# Altium PCB PCB_Down.PcbDoc (part 2 of 2)
Units mm, origin at the board's own origin, x right, y up, seen from the top; angles counter-clockwise.
Board outline 152.02 x 107.03 mm, 2 copper layers (Top Layer, Bottom Layer); 218 components, 149 nets, 1560 pads, 136 vias.
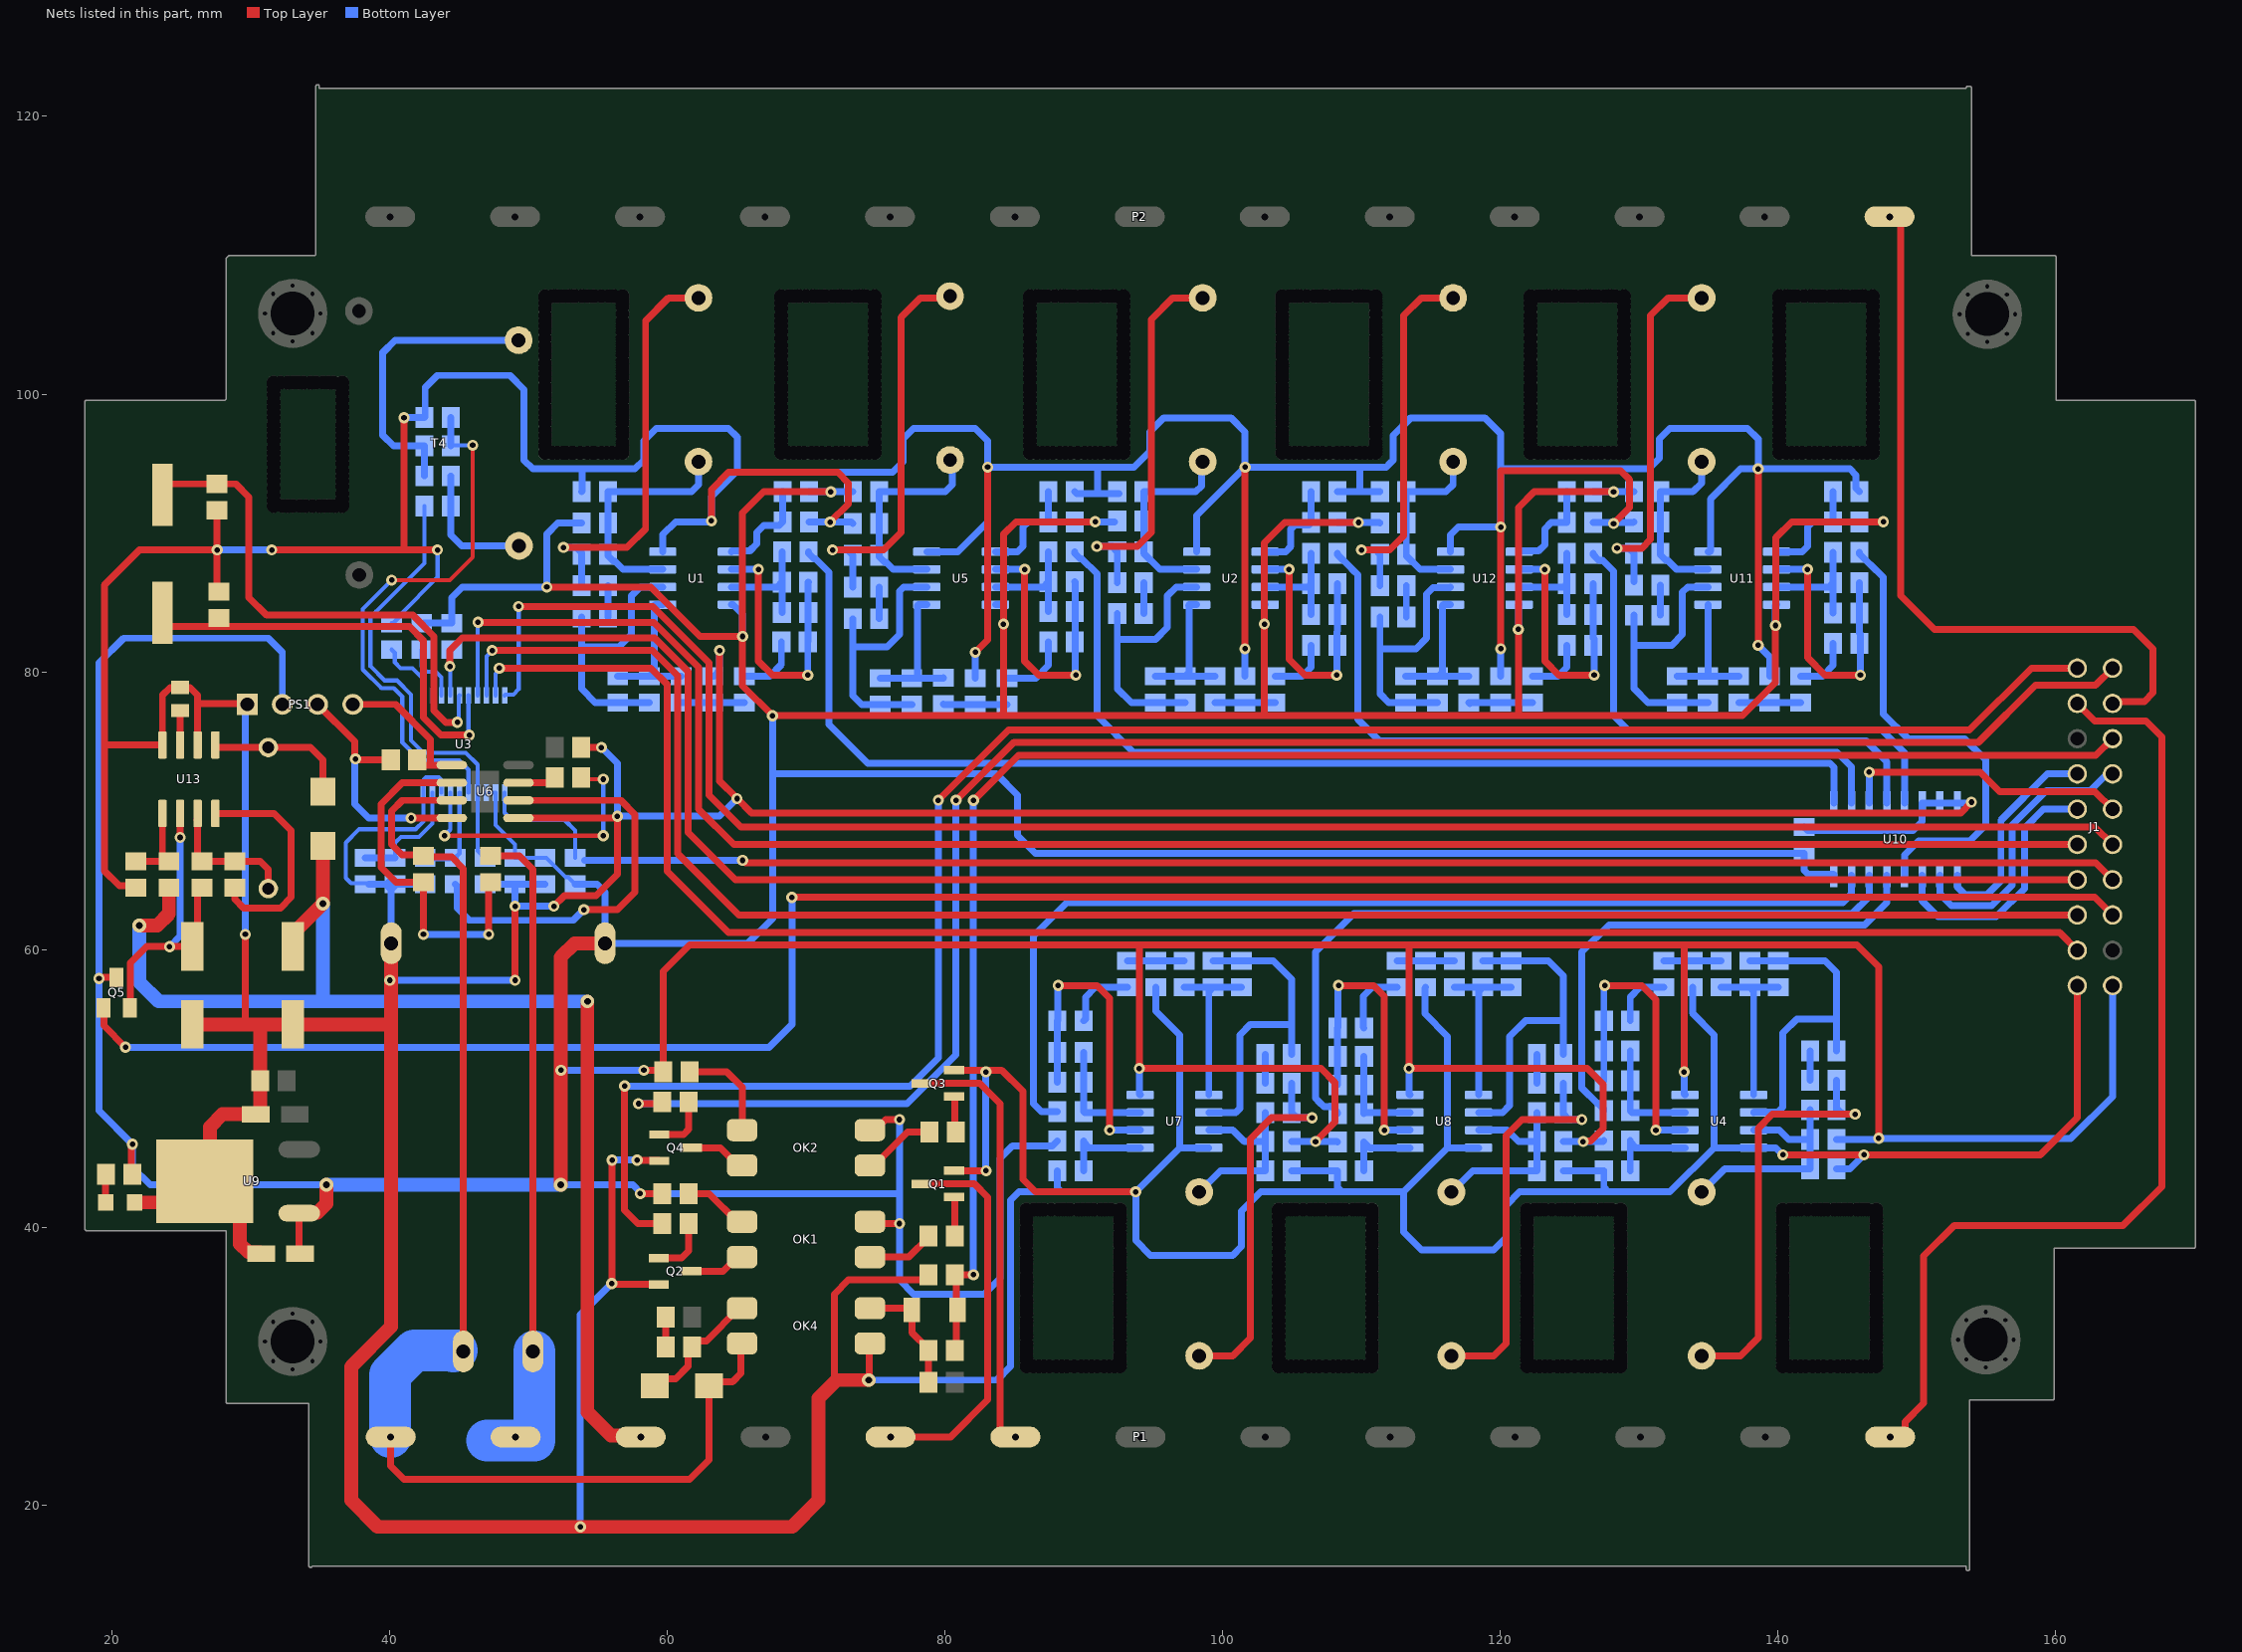
[diagram p2: the nets of this part, all layers, seen from the top]

## Via types
v1: diameter 0.8, hole 0.4, Top Layer to Bottom Layer, 115 vias
v2: diameter 1.27, hole 0.711, Top Layer to Bottom Layer, 15 vias
v3: diameter 1, hole 0.5, Top Layer to Bottom Layer, 6 vias

## Nets (pads, with @x,y where several pads share a name; then routed paths per layer and width w, separated by ;. In a path a pad name is that pad's centre, name@x,y a point inside that pad or via, vN(x,y) a via of type N, cw(c..) or ccw(c..) an arc to the next point about the centre after c; other vN are vias at no path point) (continued)
5V: ?.P$4 C12.1 C13.1 C37.1 C42.2 J1.20 OK1.4 OK2.4 PS1.2 Q5.3 R1.1 R6.2 R8.2 R20.1 R21.2 R22.2 R29.1 R33.2 R44.1 R45.1 R48.2 R51.2 R58.2 R70.2 R77.2 R83.2 R86.1 R88.2 R93.2 R101.2 R103.2 R112.2 U1.8 U2.8 U3.2 U3.3 U4.8 U5.8 U7.8 U8.8 U9.1 U10.16 U11.8 U12.8 | length 767.5
  Top Layer w0.5: v1(19.05,57.912) 19.131,57.912 19.232,58.013 20.303,58.013 Q5.3@20.32,57.996 ; R86.1@21.445,43.815 21.391,43.87 21.391,45.902 v1(21.463,45.974) ; U9.1@33.47,41.007 33.47,38.164 C42.2@33.534,38.1 ; v1(51.308,86.106) 58.801,86.106 62.357,82.55 v1(65.405,82.55) ; v1(58.039,42.418) R1.1@59.629,42.418 ; v1(58.293,51.308) 59.568,51.308 R20.1@59.695,51.181 59.695,58.425 61.595,60.325 93.853,60.325 ; v1(71.766,92.964) 66.929,92.964 65.405,91.44 v1(65.405,82.55) ; OK1.4@74.577,40.386 74.704,40.259 v1(76.708,40.259) ; OK2.4@74.577,46.99 74.958,46.99 75.72,47.752 v1(76.708,47.752) ; v1(84.201,83.439) 84.201,77.074 83.962,76.835 ; v1@84.201,83.578 84.201,89.916 85.09,90.805 v1(90.805,90.805) ; v1(106.68,46.164) 108.077,47.561 108.077,50.419 107.061,51.435 v1(93.98,51.435) 93.98,60.198 93.853,60.325 ; v1(109.769,90.754) 104.47,90.754 102.997,89.281 v1(102.997,83.439) 102.997,76.962 102.87,76.835 ; v1(125.951,46.164) 126.009,46.222 126.486,46.222 127.381,47.117 127.381,50.292 126.238,51.435 v1(113.411,51.435) 113.411,60.198 113.538,60.325 ; v1(128.143,92.964) 122.428,92.964 121.285,91.821 v1(121.285,83.058) 121.285,76.835 ; v1(133.223,51.181) 133.223,60.198 133.096,60.325 ; v1(139.806,83.335) v1@139.806,83.333 ; v1(147.241,46.403) 147.241,58.753 145.669,60.325 133.096,60.325 ; v1(147.574,90.805) 140.97,90.805 139.827,89.662 139.827,83.312 v1@139.806,83.333 ; v1(65.405,82.55) 65.405,78.994 v1(67.564,76.835) 83.962,76.835 ; 83.962,76.835 84.201,76.835 102.87,76.835 ; 93.853,60.325 113.538,60.325 ; 102.87,76.835 121.285,76.835 ; 113.538,60.325 133.096,60.325 ; 121.285,76.835 137.414,76.835 139.806,79.227 v1@139.806,83.333
  Top Layer w1: U9.1@33.47,41.007 33.508,41.045 34.785,41.045 35.433,41.693 v3(35.433,43.053) ; v3(52.324,43.053) v1(52.324,51.308) 52.324,59.451 53.325,60.452 ?.P$4@55.499,60.452
  Bottom Layer w0.3: U3.3@46.964,71.303 U3.2@47.614,71.303 47.614,68.972 49.022,67.564 C12.1@49.022,66.609 C13.1@51.181,66.609 51.281,66.609 52.681,65.209 52.84,65.209 R29.1@53.34,64.709
  Bottom Layer w0.5: PS1.2@32.258,77.656 32.258,81.407 31.242,82.423 20.828,82.423 19.05,80.645 v1(19.05,57.912) 19.05,48.387 v1(21.463,45.974) 21.463,44.323 22.733,43.053 v3(35.433,43.053) ; R45.1@42.291,83.5 R44.1@44.45,83.5 44.45,85.344 45.212,86.106 v1(51.308,86.106) 51.308,89.916 52.102,90.71 R6.2@53.812,90.71 ; v3(52.324,43.053) 57.495,43.053 v1@58.13,42.418 ; v1(52.324,51.308) v1(58.293,51.308) ; R29.1@53.34,64.709 54.925,64.709 55.499,64.135 ?.P$4@55.499,60.452 65.786,60.452 67.564,62.23 67.564,72.652 ; v1(58.039,42.418) 76.708,42.418 ; U1.8@64.597,84.836 64.72,84.836 65.405,84.151 v1(65.405,82.55) ; R21.2@70.188,92.964 v1(71.766,92.964) R48.2@73.344,92.964 ; v1(76.708,47.752) 76.708,42.418 ; U5.8@83.623,84.836 84.151,84.836 84.201,84.786 v1(84.201,83.439) ; R83.2@88.078,46.196 87.729,45.847 84.836,45.847 83.947,44.958 83.947,36.322 82.804,35.179 77.724,35.179 76.708,36.195 v1(76.708,40.259) 76.708,42.418 ; R58.2@89.341,90.805 v1(90.805,90.805) R8.2@92.206,90.805 ; v1(93.98,51.435) 93.98,49.58 94.03,49.53 U7.8@94.05,49.53 ; v1(102.997,83.439) 102.997,84.786 103.047,84.836 U2.8@103.054,84.836 ; R70.2@104.962,46.164 v1(106.68,46.164) 108.231,46.164 R88.2@108.269,46.126 ; R22.2@108.265,90.754 v1(109.769,90.754) 111.273,90.754 R101.2@111.318,90.71 ; v1(113.411,51.435) 113.411,49.58 113.461,49.53 U8.8@113.481,49.53 ; v1(121.285,83.058) 121.285,84.786 121.335,84.836 U12.8@121.342,84.836 ; R77.2@124.521,46.164 v1(125.951,46.164) 127.382,46.164 R51.2@127.446,46.228 ; R112.2@126.68,92.964 v1(128.143,92.964) R93.2@129.606,92.964 ; v1(133.223,51.181) 133.223,49.58 133.273,49.53 U4.8@133.293,49.53 ; v1(139.806,83.335) 139.806,84.786 139.856,84.836 U11.8@139.884,84.836 ; U10.16@144.018,65.354 144.018,65.388 144.001,65.405 142.152,65.405 141.859,65.698 C37.1@141.859,66.929 86.487,66.929 85.217,68.199 85.217,71.12 83.685,72.652 67.564,72.652 ; R33.2@144.206,46.323 147.161,46.323 v1(147.241,46.403) 161.084,46.403 164.084,49.403 J1.20@164.084,57.404 ; R103.2@145.857,90.78 147.549,90.78 v1(147.574,90.805) ; 67.564,72.652 v1(67.564,76.835) 67.564,72.652
  Bottom Layer w1: v3(35.433,43.053) v3(52.324,43.053)
9: P1.9 Q1.3 | length 27.9
  Top Layer w0.5: P1.9@76.065,24.892 80.391,24.892 83.058,27.559 83.058,42.164 82.108,43.114 Q1.3@78.295,43.114
11: P1.8 Q3.3 | length 31.1
  Top Layer w0.5: Q3.3@78.295,50.353 82.481,50.353 83.947,48.887 83.947,25.354 84.409,24.892 P1.8@85.065,24.892
12V: C57.1 D6.2 P1.11 R115.1 | length 90.6
  Top Layer w1: v3(21.971,61.722) 23.241,61.722 24.088,62.569 R115.1@24.088,64.455 ; C57.1@33.02,60.21 33.02,61.16 v3(35.179,63.319) D6.2@35.179,67.454 ; v3(54.229,56.261) 54.229,26.67 55.92,24.979 57.978,24.979 P1.11@58.065,24.892
  Bottom Layer w1: v3(21.971,61.722) 21.971,57.658 23.368,56.261 35.179,56.261 ; v3(35.179,63.319) 35.179,56.261 ; v3(54.229,56.261) 35.179,56.261
4051_CT_Output: J1.10 U10.3 | length 20.9
  Top Layer w0.5: v1(146.558,72.771) 154.559,72.771 155.956,71.374 162.814,71.374 J1.10@164.084,70.104
  Bottom Layer w0.5: U10.3@146.558,70.536 v1(146.558,72.771)
A: J1.9 U10.11 | length 19.3
  Bottom Layer w0.5: U10.11@150.368,65.354 150.368,63.5 151.511,62.357 155.702,62.357 157.734,64.389 157.734,68.73 159.108,70.104 J1.9@161.544,70.104
AMC_+V: C59.2 PS1.4 U6.1 | length 11.2
  Top Layer w0.5: PS1.4@37.338,77.656 40.404,77.656 42.926,75.134 42.926,73.279 ; C59.2@41.971,73.787 41.971,73.687 42.379,73.279 42.926,73.279 ; U6.1@44.463,73.279 42.926,73.279
AMC_-V: C59.1 PS1.3 U6.4 | length 18.4
  Top Layer w0.5: PS1.3@34.798,77.656 37.465,74.989 v1@37.465,73.787 ; v1(37.528,73.724) v1@37.465,73.787 ; C59.1@40.071,73.66 37.592,73.66 v1@37.465,73.787 ; v1(41.529,69.469) U6.4@44.463,69.469
  Bottom Layer w0.5: v1(37.528,73.724) 37.471,73.666 37.471,73.454 37.465,73.448 37.465,70.485 38.481,69.469 v1(41.529,69.469)
B: J1.8 U10.10 | length 20.6
  Bottom Layer w0.5: U10.10@151.638,65.354 151.638,64.008 152.489,63.157 155.371,63.157 156.845,64.631 156.845,68.973 159.312,71.44 162.48,71.44 163.684,72.644 J1.8@164.084,72.644
"Boost control": J1.16 Q5.1 | length 157
  Top Layer w0.5: Q5.1@19.37,55.796 19.402,55.764 19.402,54.512 v1(20.955,52.959) ; v1(68.961,63.754) 162.814,63.754 J1.16@164.084,62.484
  Bottom Layer w0.5: v1(20.955,52.959) 67.31,52.959 68.961,54.61 v1(68.961,63.754)
C: J1.7 U10.9 | length 15.8
  Bottom Layer w0.5: U10.9@152.908,65.354 152.925,65.337 152.925,64.499 153.467,63.957 155.039,63.957 156.045,64.963 156.045,69.304 159.385,72.644 J1.7@161.544,72.644
CF: R49.2 U3.11 | length 4.8
  Bottom Layer w0.3: R49.2@40.132,81.6 40.355,81.376 40.355,80.676 40.767,80.264 41.635,80.264 42.414,79.485 U3.11@42.414,78.303
CS: J1.11 U3.17 | length 133.1
  Top Layer w0.5: v1(46.355,83.566) 59.005,83.566 62.238,80.333 62.238,70.096 64.77,67.564 J1.11@161.544,67.564
  Bottom Layer w0.3: U3.17@46.314,78.303 46.314,83.525 v1(46.355,83.566)
CT_1: C8.1 U10.4 | length 54.9
  Bottom Layer w0.5: C8.1@108.265,88.544 108.265,88.444 109.121,87.589 109.124,87.589 109.419,87.293 109.419,87.29 109.728,86.981 109.728,76.581 111.303,75.006 146.355,75.006 147.828,73.533 U10.4@147.828,70.536
CT_2: C20.1 U10.13 | length 37.5
  Bottom Layer w0.5: C20.1@127.446,48.387 127.446,48.487 127.046,48.887 126.992,48.887 125.857,50.022 125.857,59.817 127.813,61.773 146.228,61.773 147.828,63.373 U10.13@147.828,65.354
CT_3: C36.1 U10.15 | length 75.6
  Bottom Layer w0.5: C36.1@88.078,48.323 86.932,48.323 86.36,48.895 86.36,60.96 88.773,63.373 144.653,63.373 145.288,64.008 U10.15@145.288,65.354
CT_4: C48.1 U10.12 | length 34
  Bottom Layer w0.5: C48.1@145.857,88.595 145.857,88.495 146.629,87.723 146.657,87.723 147.574,86.806 147.574,76.962 149.352,75.184 153.416,75.184 154.94,73.66 154.94,68.961 153.797,67.818 150.114,67.818 149.098,66.802 U10.12@149.098,65.354
CT_5: C7.1 U10.1 | length 89.4
  Bottom Layer w0.5: C7.1@70.165,88.646 70.165,88.546 70.565,88.146 70.665,88.146 71.628,87.183 71.628,76.2 74.422,73.406 143.725,73.406 144.018,73.113 U10.1@144.018,70.536
CT_6: C28.1 U10.2 | length 71
  Bottom Layer w0.5: C28.1@89.341,88.646 89.341,88.546 89.741,88.146 89.841,88.146 90.932,87.055 90.932,76.835 93.561,74.206 144.234,74.206 145.288,73.152 U10.2@145.288,70.536
CT_7: C40.1 U10.14 | length 55.7
  Bottom Layer w0.5: C40.1@108.269,48.184 108.269,48.268 107.869,48.668 107.292,48.668 106.973,48.987 106.68,49.28 106.68,59.817 109.436,62.573 145.326,62.573 146.558,63.805 U10.14@146.558,65.354
CT_8: C53.1 U10.5 | length 38.2
  Bottom Layer w0.5: C53.1@126.68,88.544 126.68,88.444 127.08,88.044 127.348,88.044 128.143,87.249 128.143,76.835 129.172,75.806 147.46,75.806 149.098,74.168 U10.5@149.098,70.536
DIN: J1.12 U3.20 | length 134.7
  Top Layer w0.5: v1(49.276,84.709) 58.928,84.709 62.992,80.645 62.992,71.12 65.278,68.834 162.814,68.834 J1.12@164.084,67.564
  Bottom Layer w0.3: U3.20@48.264,78.303 48.314,78.353 48.314,78.359 48.895,78.359 49.276,78.74 v1(49.276,84.709)
DIn2: C30.2 D3.1 J1.6 R67.1 | length 124.8
  Top Layer w0.5: R67.1@80.701,31.115 80.8,31.214 80.8,33.937 D3.1@80.899,34.036 80.803,34.132 80.803,36.48 80.899,36.576 v1(82.042,36.576) ; v1(82.042,70.739) 85.283,73.98 162.88,73.98 J1.6@164.084,75.184
  Bottom Layer w0.5: v1(82.042,36.576) 82.027,36.591 82.027,70.724 v1(82.042,70.739)
DOUT: J1.17 U3.19 | length 132
  Top Layer w0.5: v1(47.879,80.264) 58.801,80.264 59.976,79.089 59.976,65.627 64.389,61.214 160.274,61.214 J1.17@161.544,59.944
  Bottom Layer w0.3: U3.19@47.614,78.303 47.614,79.864 47.879,80.129 v1(47.879,80.264)
Dout1: J1.1 R7.2 | length 140
  Top Layer w0.5: v1(56.911,50.165) 56.911,41.223 57.875,40.259 R7.2@59.629,40.259 ; v1(79.502,70.754) 84.551,75.803 153.781,75.803 158.242,80.264 J1.1@161.544,80.264
  Bottom Layer w0.5: v1(56.911,50.165) 77.47,50.165 79.502,52.197 v1(79.502,70.754)
Dout2: J1.2 R27.2 | length 131.7
  Top Layer w0.5: v1(57.912,48.895) 59.502,48.895 R27.2@59.629,49.022 ; v1(80.787,70.754) 80.787,70.763 84.955,74.93 154.432,74.93 158.537,79.035 162.855,79.035 J1.2@164.084,80.264
  Bottom Layer w0.5: v1(57.912,48.895) 77.266,48.895 80.772,52.401 80.772,70.739 v1(80.787,70.754)
GND: ?.P$3 C11.2 C12.2 C13.2 C16.2 C18.1 C19.2 C24.1 C25.1 C26.1 C30.1 C37.2 C42.1 C43.1 C44.2 C55.2 C56.1 C57.2 C58.1 D5.1 J1.19 OK4.3 PS1.1 Q1.2 Q2.2 Q3.2 Q4.2 R2.1 R3.1 R23.1 R24.1 R25.1 R26.1 R30.1 R38.1 R49.1 R55.1 R57.1 R60.1 R61.1 R68.1 R71.1 R85.1 R87.1 R89.1 R90.1 R91.1 R95.1 R108.1 R111.1 R113.1 R114.1 R116.1 U1.4 U2.4 U3.8 U3.10 U4.4 U5.4 U6.5 U7.4 U8.4 U9.4 U10.6 U10.7 U10.8 U11.4 U12.4 U13.2 U13.4 | length 999.3
  Top Layer w0.5: R116.1@21.717,64.455 21.591,64.58 20.51,64.58 19.431,65.659 19.431,74.676 ; U13.2@26.162,74.733 26.162,77.724 ; C16.2@27.559,85.598 v1(27.559,88.773) ; C19.2@27.813,91.633 27.559,91.379 v1(27.559,88.773) ; 29.464,54.61 29.591,54.737 v1(29.591,61.087) ; PS1.1@29.718,77.656 29.65,77.724 26.162,77.724 ; v1(31.496,88.773) 41.021,88.773 ; v1(41.021,98.298) 41.021,88.773 ; v1(43.434,88.773) 41.021,88.773 ; v1(49.022,57.785) v1(49.022,63.119) ; U6.5@49.263,69.469 56.261,69.469 v1(56.388,69.596) 56.388,65.405 54.864,63.881 52.578,63.881 v1(51.816,63.119) ; C58.1@53.782,74.549 v1(55.245,74.549) ; v1@56.007,35.921 v1(56.007,44.831) ; v1@56.129,35.88 Q2.2@59.372,35.88 ; v1(57.815,44.831) 57.846,44.801 59.374,44.801 Q4.2@59.404,44.77 ; v1(63.159,90.868) 63.159,93.131 64.389,94.361 72.263,94.361 73.025,93.599 73.025,92.092 v1(71.712,90.78) ; v1(63.754,81.534) 63.754,72.136 65,70.89 v1(65,70.866) 65.024,70.866 66.055,69.835 153.147,69.835 v1(153.924,70.612) ; 72.167,28.987 72.009,29.145 72.009,35.179 73.025,36.195 78.425,36.195 C30.1@78.806,36.576 ; v3(74.479,28.987) 74.528,29.036 74.528,31.574 OK4.3@74.577,31.623 ; Q1.2@80.645,44.064 82.943,44.064 v1(82.948,44.069) ; Q3.2@80.645,51.303 84.079,51.303 85.598,49.784 85.598,43.434 86.487,42.545 v1(93.726,42.545) ; v1(82.169,81.407) 83.058,82.296 v1(83.058,94.742) ; v1(101.6,81.661) 101.6,94.742 v1(101.603,94.745) ; v1(120.015,81.661) v1(120.015,90.424) 120.015,94.488 128.651,94.488 129.286,93.853 129.286,91.821 v1(128.143,90.678) ; v1(138.557,81.915) v1(138.557,94.615) ; v1(140.335,45.212) v1(146.177,45.212) 158.877,45.212 161.544,47.879 J1.19@161.544,57.404 ; 19.431,74.676 19.431,86.233 21.971,88.773 v1(27.559,88.773) ; 19.431,74.676 19.488,74.733 U13.4@23.622,74.733 23.622,78.32 24.169,78.867 C56.1@24.892,78.866 C56.1@24.892,78.866 C56.1@24.892,78.866 25.615,78.867 26.162,78.32 26.162,77.724
  Top Layer w1: D5.1@21.624,41.783 25.146,41.783 U9.4@26.67,43.307 ; C55.2@25.781,54.61 29.464,54.61 30.734,54.61 ; C42.1@30.734,38.1 30.635,38.199 29.796,38.199 29.21,38.785 29.21,40.807 26.71,43.307 U9.4@26.67,43.307 ; ?.P$3@40.099,60.452 40.099,54.61 ; v3(74.479,28.987) 72.167,28.987 70.866,27.686 70.866,20.32 68.961,18.415 v1(53.721,18.415) 39.116,18.415 37.211,20.32 37.211,29.955 40.099,32.843 40.099,54.61 ; U9.4@26.67,43.307 27.028,43.665 27.028,47.221 27.94,48.133 C43.1@30.353,48.133 30.573,48.133 30.673,48.232 C44.2@30.673,50.546 30.673,54.549 30.734,54.61 ; 30.734,54.61 C57.2@33.02,54.61 40.099,54.61
  Bottom Layer w0.3: C26.1@38.481,64.709 38.412,64.778 37.203,64.778 36.83,65.151 36.83,67.691 37.804,68.665 41.862,68.665 42.418,69.221 42.418,71.299 U3.10@42.414,71.303 42.418,71.307 42.418,72.214 42.594,72.39 43.538,72.39 43.714,72.214 U3.8@43.714,71.303 ; R49.1@40.132,83.5 40.232,83.5 40.732,84 40.732,84.1 43.434,86.802 v1(43.434,88.773)
  Bottom Layer w0.5: v1(27.559,88.773) v1(31.496,88.773) ; v1(29.591,61.087) 29.591,77.529 PS1.1@29.718,77.656 ; C26.1@38.481,64.709 40.132,64.709 C25.1@40.386,64.709 C18.1@42.545,64.709 ; v1(40.005,57.785) v1(49.022,57.785) ; ?.P$3@40.099,60.452 C25.1@40.099,64.676 ; v1(41.021,98.298) 41.046,98.323 C11.2@42.483,98.323 42.545,98.385 42.545,100.457 43.434,101.346 48.641,101.346 49.657,100.33 49.657,95.25 50.292,94.615 53.848,94.615 ; C24.1@46.863,64.709 C12.2@49.022,64.709 ; C13.2@51.181,64.709 C12.2@49.022,64.709 ; v1(51.816,63.119) v1(49.022,63.119) C12.2@49.022,64.709 ; v1(53.721,18.415) 53.721,33.684 v1(55.982,35.945) ; R23.1@53.812,92.964 53.848,93 53.848,94.615 ; v1@55.25,74.544 56.388,73.406 v1(56.388,69.596) 63.73,69.596 v1(65,70.866) ; v1(56.007,44.831) v1(57.815,44.831) ; U1.4@59.657,88.646 59.657,89.883 60.579,90.805 63.246,90.805 63.183,90.868 v1(63.159,90.868) 63.159,92.623 65.024,94.488 ; R2.1@63.252,79.69 63.352,79.69 63.754,80.092 v1(63.754,81.534) ; R25.1@70.188,90.78 v1(71.712,90.78) 73.242,90.78 R60.1@73.344,90.678 ; v3(74.479,28.987) 83.724,28.987 84.701,29.964 84.701,41.93 85.316,42.545 88.371,42.545 ; U5.4@78.683,88.646 80.899,88.646 83.058,90.805 v1(83.058,94.742) ; R38.1@82.169,79.542 v1(82.169,81.407) ; v1(82.931,51.181) 82.931,44.086 v1(82.948,44.069) ; R87.1@88.078,44.069 88.078,42.838 88.371,42.545 ; R61.1@89.341,92.964 89.468,92.837 90.996,92.837 ; R24.1@92.523,92.837 90.996,92.837 ; R68.1@95.174,57.277 95.174,55.575 96.901,53.848 96.901,45.72 ; U2.4@98.114,88.646 98.114,91.256 v1(101.603,94.745) ; U7.4@98.99,45.72 96.901,45.72 ; R3.1@101.6,79.69 v1(101.6,81.661) ; R85.1@104.962,44.069 R90.1@108.269,44.069 108.269,42.861 108.585,42.545 ; R26.1@108.265,92.964 109.855,92.964 ; R113.1@111.318,92.964 109.855,92.964 ; R71.1@114.605,57.277 114.554,57.227 114.554,55.372 116.183,53.743 116.183,45.72 ; U12.4@116.402,88.646 116.402,89.859 116.967,90.424 v1(120.015,90.424) 120.015,94.615 ; U8.4@118.421,45.72 116.183,45.72 ; R95.1@120.015,79.69 v1(120.015,81.661) ; R89.1@124.521,44.069 R57.1@127.446,44.069 127.446,42.861 127.762,42.545 ; R114.1@126.68,90.754 129.556,90.754 R108.1@129.606,90.805 ; R30.1@133.826,57.277 133.826,55.404 135.382,53.848 135.382,45.72 ; U11.4@134.944,88.646 135.078,88.646 135.128,88.696 135.128,92.456 137.287,94.615 v1(138.557,94.615) ; v1(138.557,81.915) 139.382,81.09 R91.1@139.382,79.69 ; v1(140.335,45.212) 139.827,45.72 U4.4@138.233,45.72 135.382,45.72 ; C37.2@141.859,68.829 142.108,68.58 149.733,68.58 150.368,69.215 U10.6@150.368,70.536 U10.7@151.638,70.536 U10.8@152.908,70.536 153.848,70.536 v1(153.924,70.612) ; R55.1@144.206,44.196 145.161,44.196 v1(146.177,45.212) ; R111.1@145.857,92.964 145.605,93.216 145.605,94.171 145.161,94.615 139.192,94.615 v1(138.557,94.615) ; 53.848,94.615 57.658,94.615 58.293,95.25 58.293,96.647 59.182,97.536 64.389,97.536 65.024,96.901 65.024,94.488 ; 65.024,94.488 65.151,94.361 76.2,94.361 76.962,95.123 76.962,96.774 77.724,97.536 82.169,97.536 83.058,96.647 v1(83.058,94.742) ; v1(83.058,94.742) 83.061,94.745 90.996,94.745 ; 88.371,42.545 v1(93.726,42.545) ; 90.996,92.837 90.996,94.745 ; 90.996,94.745 93.602,94.745 94.742,95.885 94.742,97.282 95.758,98.298 100.584,98.298 101.603,97.279 v1(101.603,94.745) ; v1(93.726,42.545) 93.726,39.033 94.786,37.973 100.711,37.973 101.346,38.608 101.346,41.148 102.743,42.545 108.585,42.545 ; v1(93.726,42.545) 96.901,45.72 ; v1(101.603,94.745) 109.851,94.745 ; 108.585,42.545 113.008,42.545 ; 109.851,94.745 109.851,92.968 109.855,92.964 ; 109.851,94.745 111.763,94.745 112.058,95.04 112.268,95.25 112.268,97.028 113.538,98.298 118.872,98.298 120.015,97.155 120.015,94.615 ; 113.008,42.545 113.008,40.208 113.008,39.646 114.3,38.354 119.507,38.354 120.396,39.243 120.396,41.557 121.384,42.545 127.762,42.545 ; 113.008,42.545 116.183,45.72 ; 120.015,94.615 130.683,94.615 131.445,95.377 131.445,96.774 132.207,97.536 137.795,97.536 138.557,96.774 v1(138.557,94.615) ; 127.762,42.545 132.207,42.545 135.382,45.72
  Bottom Layer w1: C25.1@40.099,64.676 C25.1@40.132,64.709
IRQ: J1.13 R44.2 U3.14 | length 136.1
  Top Layer w0.5: v1(44.323,80.391) 44.323,81.534 45.227,82.438 59.066,82.438 61.484,80.02 61.484,68.437 64.897,65.024 J1.13@161.544,65.024
  Bottom Layer w0.3: U3.14@44.364,78.303 R44.2@44.364,81.514
  Bottom Layer w0.4: R44.2@44.364,81.514 R44.2@44.45,81.6
L: ?.P$2 P1.12 R63.1 | length 48.1
  Top Layer w0.5: R63.1@46.99,66.736 49.342,66.736 50.299,65.779 ?.P$2@50.299,31.052
  Bottom Layer w3: 47.011,24.638 P1.12@50.419,24.638 ; P1.12@50.419,24.765 ?.P$2@50.419,31.044
N: ?.P$1 D4.1 OK4.2 P1.13 R59.2 U6.3 | length 93.8
  Top Layer w0.5: P1.13@40.065,24.892 40.065,22.8 41.021,21.844 61.595,21.844 62.992,23.241 D4.1@62.992,28.575 63.294,28.877 64.691,28.877 65.277,29.463 OK4.2@65.277,31.423 ; U6.3@44.463,70.739 42.418,70.739 40.894,70.739 40.124,69.969 40.124,67.572 40.885,66.811 42.281,66.811 42.418,66.675 44.45,66.675 45.299,65.826 ?.P$1@45.299,31.052
  Bottom Layer w3: P1.13@40.065,24.892 40.005,24.952 40.005,29.358 41.762,31.115 44.498,31.115 ; ?.P$1@44.561,31.052 44.498,31.115 ; ?.P$1@44.831,31.115 44.498,31.115
NetC1_1: C1.1 R4.2 R13.1 U1.1 | length 10.4
  Bottom Layer w0.5: R13.1@56.411,79.69 C1.1@58.692,79.69 ; U1.1@59.657,84.836 59.105,84.836 59.055,84.786 59.055,80.054 C1.1@58.692,79.69 ; R4.2@60.972,79.69 C1.1@58.692,79.69
NetC1_2: C1.2 R12.1 R13.2 U1.2 | length 19.7
  Bottom Layer w0.5: R12.1@53.812,83.947 53.812,81.788 ; C1.2@58.692,77.79 R13.2@56.411,77.79 54.798,77.79 53.812,78.776 53.812,81.788 ; U1.2@59.657,86.106 58.039,86.106 57.404,85.471 57.404,82.677 56.515,81.788 53.812,81.788
NetC2_1: C2.1 R9.2 | length 4.7
  Bottom Layer w0.5: C2.1@65.532,79.69 67.371,79.69 68.204,80.523 R9.2@68.204,82.169
NetC2_2: C2.2 R2.2 R4.1 | length 4.6
  Bottom Layer w0.5: R4.1@60.972,77.79 C2.2@65.532,77.79
NetC3_1: C3.1 R5.2 R16.1 U2.1 | length 10.2
  Bottom Layer w0.5: R16.1@95.123,79.69 C3.1@97.282,79.69 ; U2.1@98.114,84.836 97.586,84.836 97.536,84.786 97.567,84.786 97.567,79.975 C3.1@97.282,79.69 ; R5.2@99.441,79.691 C3.1@97.282,79.69
NetC3_2: C3.2 R15.1 R16.2 U2.2 | length 19.3
  Bottom Layer w0.5: R15.1@92.396,84.201 92.396,82.327 ; C3.2@97.282,77.79 R16.2@95.123,77.79 93.406,77.79 92.396,78.8 92.396,82.327 ; U2.2@98.114,86.106 96.647,86.106 96.012,85.471 96.012,83.185 95.154,82.327 92.396,82.327
NetC4_1: C4.1 R11.2 | length 4.5
  Bottom Layer w0.5: C4.1@103.759,79.69 105.725,79.69 106.365,80.33 R11.2@106.365,81.915
NetC4_2: C4.2 R3.2 R5.1 | length 4.3
  Bottom Layer w0.5: R5.1@99.441,77.791 C4.2@103.759,77.79
NetC5_1: C5.1 R12.2 | length 2.3
  Bottom Layer w0.5: R12.2@55.712,83.947 C5.1@55.712,86.201
NetC5_2: C5.2 R18.2 T2.1 | length 29.8
  Top Layer w0.5: v1(52.507,88.956) 57.079,88.956 58.42,90.297 58.42,105.283 60.071,106.934 T2.1@62.23,106.934
  Bottom Layer w0.5: v1(52.507,88.956) 53.412,88.956 53.812,88.556 C5.2@53.812,86.201
NetC6_1: C6.1 R15.2 | length 2.2
  Bottom Layer w0.5: R15.2@94.296,84.201 C6.1@94.296,86.424
NetC6_2: C6.2 R19.2 T3.1 | length 27.9
  Top Layer w0.5: v1(90.932,89.027) 93.853,89.027 94.85,90.024 94.85,105.391 96.393,106.934 T3.1@98.552,106.934
  Bottom Layer w0.5: v1(90.932,89.027) 92.015,89.027 R19.2@92.396,88.646 C6.2@92.396,86.424
NetC7_2: C7.2 C9.1 R14.1 U1.7 | length 8.2
  Bottom Layer w0.5: U1.7@64.597,86.106 67.886,86.106 R14.1@68.242,86.462 ; C9.1@68.242,84.277 68.253,84.289 68.253,88.635 C7.2@68.265,88.646
NetC8_2: C8.2 C10.1 R17.1 U2.7 | length 7.8
  Bottom Layer w0.5: U2.7@103.054,86.106 106.136,86.106 C10.1@106.365,86.335 ; R17.1@106.365,84.125 C10.1@106.365,86.335 ; C8.2@106.365,88.544 C10.1@106.365,86.335
NetC9_2: C9.2 R9.1 R14.2 U1.6 | length 19.1
  Top Layer w0.5: v1(66.548,87.376) 66.548,80.772 67.564,79.756 v1@69.965,79.756
  Bottom Layer w0.5: U1.6@64.597,87.376 v1(66.548,87.376) ; v1(70.104,79.756) R9.1@70.104,82.169 70.123,82.188 70.123,86.443 R14.2@70.142,86.462
NetC10_2: C10.2 R11.1 R17.2 U2.6 | length 18.7
  Top Layer w0.5: v1(104.775,87.376) 104.775,80.899 105.918,79.756 v1(108.204,79.756)
  Bottom Layer w0.5: U2.6@103.054,87.376 v1(104.775,87.376) ; v1(108.204,79.756) 108.204,82.87 108.265,82.931 R17.2@108.265,84.125 C10.2@108.265,86.335
NetC14_1: C14.1 R31.2 R40.1 U4.1 | length 12
  Bottom Layer w0.5: R31.2@135.89,57.277 R40.1@137.954,57.277 ; U4.1@138.233,49.53 138.233,56.998 R40.1@137.954,57.277 ; C14.1@140.017,57.277 R40.1@137.954,57.277
NetC14_2: C14.2 R39.1 R40.2 U4.2 | length 24.1
  Bottom Layer w0.5: R40.2@137.954,59.177 C14.2@140.017,59.177 143.388,59.177 144.206,58.359 144.206,54.991 ; U4.2@138.233,48.26 138.247,48.274 139.968,48.274 140.335,48.641 140.335,53.975 141.351,54.991 144.206,54.991 ; R39.1@144.206,52.705 144.206,54.991
NetC15_1: C15.1 R35.2 | length 4.4
  Bottom Layer w0.5: R35.2@129.346,54.864 129.346,56.575 130.048,57.277 C15.1@131.762,57.277
NetC15_2: C15.2 R30.2 R31.1 | length 4.1
  Bottom Layer w0.5: C15.2@131.762,59.177 R30.2@133.826,59.177 R31.1@135.89,59.177
NetC16_1: C16.1 U3.16 Y1.2 | length 32.2
  Top Layer w0.5: Y1.2@23.622,84.244 23.622,83.751 24.122,83.251 27.686,83.251 41.412,83.251 42.418,82.246 42.418,76.708 43.688,75.438 v1(45.72,75.438)
  Bottom Layer w0.3: U3.16@45.664,78.303 45.664,75.494 v1(45.72,75.438)
NetC17_1: C17.1 R39.2 | length 2.1
  Bottom Layer w0.5: C17.1@142.306,50.578 R39.2@142.306,52.705
NetC17_2: C17.2 R47.2 T5.1 | length 30.8
  Top Layer w0.5: T5.1@134.493,30.734 137.287,30.734 138.557,32.004 138.557,47.117 139.573,48.133 v1(145.542,48.133)
  Bottom Layer w0.5: C17.2@144.206,50.578 R47.2@144.206,48.45 144.269,48.514 144.65,48.133 v1(145.542,48.133)
NetC18_2: C18.2 R34.1 U3.6 | length 7
  Bottom Layer w0.3: R34.1@44.704,66.609 45.014,66.919 U3.6@45.014,71.303
  Bottom Layer w0.5: C18.2@42.545,66.609 R34.1@44.704,66.609
NetC19_1: C19.1 U3.15 Y1.1 | length 38.2
  Top Layer w0.5: Y1.1@23.622,92.744 23.622,93.033 24.122,93.533 28.895,93.533 29.845,92.583 29.845,85.344 31.115,84.074 41.656,84.074 43.18,82.55 43.18,77.216 44.034,76.362 v1(44.86,76.362)
  Bottom Layer w0.3: v1(44.86,76.362) 44.968,76.47 44.968,78.257 U3.15@45.014,78.303
NetC20_2: C20.2 C23.1 R41.1 U4.7 | length 8.3
  Bottom Layer w0.5: C23.1@129.346,52.705 R41.1@129.346,50.546 C20.2@129.346,48.387 129.473,48.26 U4.7@133.293,48.26
NetC21_1: C21.1 R46.2 R53.1 U5.1 | length 10.5
  Bottom Layer w0.5: R53.1@75.311,79.542 75.322,79.553 C21.1@78.105,79.553 ; U5.1@78.683,84.836 78.073,84.836 78.023,84.786 78.023,79.635 C21.1@78.105,79.553 ; R46.2@79.883,79.563 79.872,79.553 C21.1@78.105,79.553
NetC21_2: C21.2 R52.1 R53.2 U5.2 | length 19
  Bottom Layer w0.5: R52.1@73.344,83.82 73.344,81.788 ; C21.2@77.597,77.642 R53.2@75.311,77.642 73.996,77.642 73.344,78.294 73.344,81.788 ; U5.2@78.683,86.106 77.001,86.106 76.708,85.813 76.708,82.677 75.819,81.788 73.344,81.788
NetC22_1: C22.1 R50.2 | length 5.1
  Bottom Layer w0.5: C22.1@84.455,79.542 86.527,79.542 87.441,80.456 R50.2@87.441,82.169
NetC22_2: C22.2 R38.2 R46.1 | length 4.6
  Bottom Layer w0.5: R46.1@79.883,77.663 79.894,77.653 84.444,77.653 C22.2@84.455,77.642
NetC23_2: C23.2 R35.1 R41.2 U4.6 | length 22.6
  Top Layer w0.5: v1@127.37,57.404 130.175,57.404 131.191,56.388 v1(131.191,46.99)
  Bottom Layer w0.5: R41.2@127.446,50.546 C23.2@127.446,52.705 127.446,57.261 127.508,57.323 v1(127.508,57.404) ; v1(131.191,46.99) U4.6@133.293,46.99
NetC25_2: C25.2 C26.2 U3.9 | length 8.7
  Bottom Layer w0.3: C25.2@40.386,66.609 40.386,67.691 40.806,68.111 42.092,68.111 43.064,69.083 U3.9@43.064,71.303
  Bottom Layer w0.5: C26.2@38.227,66.609 C25.2@40.386,66.609
NetC27_1: C27.1 R52.2 | length 2.3
  Bottom Layer w0.5: R52.2@75.244,83.82 C27.1@75.244,86.106
NetC27_2: C27.2 R56.2 T7.1 | length 29.1
  Top Layer w0.5: v1(71.882,88.773) 75.565,88.773 76.835,90.043 76.835,105.537 78.232,106.934 T7.1@80.518,106.934
  Bottom Layer w0.5: v1(71.882,88.773) 72.963,88.773 R56.2@73.344,88.392 C27.2@73.344,86.106
NetC28_2: C28.2 C29.1 R54.1 U5.7 | length 8.3
  Bottom Layer w0.5: U5.7@83.623,86.106 87.06,86.106 R54.1@87.441,86.487 ; C29.1@87.441,84.328 R54.1@87.441,86.487 ; C28.2@87.441,88.646 R54.1@87.441,86.487
NetC29_2: C29.2 R50.1 R54.2 U5.6 | length 19.5
  Top Layer w0.5: v1(85.725,87.376) 85.725,80.772 86.741,79.756 v1@89.328,79.756
  Bottom Layer w0.5: U5.6@83.623,87.376 v1(85.725,87.376) ; R54.2@89.341,86.487 89.374,86.453 v1@89.374,79.756
  other v1: 89.408,79.756
NetC31_1: C31.1 R69.2 R74.1 U7.1 | length 12
  Bottom Layer w0.5: R69.2@97.231,57.277 C31.1@99.289,57.277 ; U7.1@98.99,49.53 98.99,56.978 C31.1@99.289,57.277 ; R74.1@101.346,57.277 C31.1@99.289,57.277
NetC31_2: C31.2 R73.1 R74.2 U7.2 | length 23.3
  Bottom Layer w0.5: U7.2@98.99,48.26 100.926,48.26 101.219,48.553 101.219,53.848 101.981,54.61 104.962,54.61 ; C31.2@99.289,59.177 R74.2@101.346,59.177 103.637,59.177 104.962,57.852 104.962,54.61 ; R73.1@104.962,52.451 104.962,54.61
NetC32_1: C32.1 R72.2 | length 5.1
  Bottom Layer w0.5: R72.2@89.978,54.864 90.107,54.993 90.107,56.579 90.805,57.277 C32.1@93.116,57.277
NetC32_2: C32.2 R68.2 R69.1 | length 4.1
  Bottom Layer w0.5: C32.2@93.116,59.177 R68.2@95.174,59.177 R69.1@97.231,59.177
NetC33_1: C33.1 R73.2 | length 2.1
  Bottom Layer w0.5: C33.1@103.062,50.355 R73.2@103.062,52.451
NetC33_2: C33.2 R78.2 T9.1 | length 27.4
  Top Layer w0.5: T9.1@98.298,30.734 100.711,30.734 101.981,32.004 101.981,46.355 103.505,47.879 v1(106.426,47.879)
  Bottom Layer w0.5: C33.2@104.962,50.355 R78.2@104.962,48.26 105.343,47.879 v1(106.426,47.879)
NetC34_1: C34.1 R76.2 R81.1 U8.1 | length 12
  Bottom Layer w0.5: R76.2@116.662,57.277 C34.1@118.72,57.277 ; U8.1@118.421,49.53 118.421,56.979 C34.1@118.72,57.277 ; R81.1@120.777,57.277 C34.1@118.72,57.277
NetC34_2: C34.2 R80.1 R81.2 U8.2 | length 23.6
  Bottom Layer w0.5: U8.2@118.421,48.26 120.142,48.26 120.65,48.768 120.65,53.721 121.793,54.864 124.46,54.864 ; C34.2@118.72,59.177 R81.2@120.777,59.177 123.449,59.177 124.521,58.105 124.521,54.864 R80.1@124.521,52.451
NetC35_1: C35.1 R79.2 | length 5
  Bottom Layer w0.5: R79.2@110.169,54.356 110.109,54.416 110.109,56.642 110.744,57.277 C35.1@112.547,57.277
NetC35_2: C35.2 R71.2 R76.1 | length 4.1
  Bottom Layer w0.5: C35.2@112.547,59.177 R76.1@116.662,59.177
NetC36_2: C36.2 C38.1 R75.1 U7.7 | length 8.4
  Bottom Layer w0.5: C38.1@89.978,52.578 R75.1@89.978,50.451 C36.2@89.978,48.323 90.042,48.26 U7.7@94.05,48.26
NetC38_2: C38.2 R72.1 R75.2 U7.6 | length 22.8
  Top Layer w0.5: v1(88.138,57.404) 90.932,57.404 91.843,56.493 91.843,47.005 91.836,46.997 v1(91.843,46.99)
  Bottom Layer w0.5: R75.2@88.078,50.451 C38.2@88.078,52.578 R72.1@88.078,54.864 88.108,54.894 88.108,57.374 v1(88.138,57.404) ; v1(91.843,46.99) U7.6@94.05,46.99
NetC39_1: C39.1 R80.2 | length 2.1
  Bottom Layer w0.5: C39.1@122.621,50.355 R80.2@122.621,52.451
NetC39_2: C39.2 R84.2 T10.1 | length 28.9
  Top Layer w0.5: T10.1@116.459,30.734 119.507,30.734 120.396,31.623 120.396,46.609 121.539,47.752 v1(125.857,47.752)
  Bottom Layer w0.5: C39.2@124.521,50.355 R84.2@124.521,48.26 124.521,48.16 124.921,47.76 125.849,47.76 v1(125.857,47.752)
NetC40_2: C40.2 C41.1 R82.1 U8.7 | length 7.5
  Bottom Layer w0.5: C41.1@110.169,52.299 R82.1@110.169,50.241 C40.2@110.169,48.184 110.245,48.26 U8.7@113.481,48.26
NetC41_2: C41.2 R79.1 R82.2 U8.6 | length 22.3
  Top Layer w0.5: v1@108.361,57.404 110.871,57.404 111.633,56.642 v1(111.633,46.99)
  Bottom Layer w0.5: R82.2@108.269,50.241 R79.1@108.269,54.356 108.3,54.387 v1@108.3,57.404 ; v1(111.633,46.99) U8.6@113.481,46.99
  other v1: 108.331,57.404
NetC45_1: C45.1 R92.2 R97.1 U11.1 | length 9.6
  Bottom Layer w0.5: R97.1@132.715,79.69 C45.1@134.937,79.69 ; U11.1@134.944,84.836 134.944,79.696 C45.1@134.937,79.69 ; R92.2@137.16,79.691 C45.1@134.937,79.69
NetC45_2: C45.2 R96.1 R97.2 U11.2 | length 19.9
  Bottom Layer w0.5: R96.1@129.606,84.074 129.606,81.915 ; C45.2@134.937,77.79 R97.2@132.715,77.79 130.617,77.79 129.606,78.801 129.606,81.915 ; U11.2@134.944,86.106 133.477,86.106 133.096,85.725 133.096,82.677 132.334,81.915 129.606,81.915
NetC46_1: C46.1 R94.2 | length 4.3
  Bottom Layer w0.5: C46.1@141.605,79.69 143.19,79.69 143.957,80.457 R94.2@143.957,82.042
NetC46_2: C46.2 R91.2 R92.1 | length 4.4
  Bottom Layer w0.5: R92.1@137.16,77.791 C46.2@141.605,77.79
NetC47_1: C47.1 R96.2 | length 2.2
  Bottom Layer w0.5: R96.2@131.506,84.074 C47.1@131.506,86.233
NetC47_2: C47.2 R100.2 T12.1 | length 26.4
  Top Layer w0.5: v1(128.397,88.9) 130.175,88.9 130.81,89.535 130.81,105.664 132.08,106.934 T12.1@134.493,106.934
  Bottom Layer w0.5: v1(128.397,88.9) 129.225,88.9 R100.2@129.606,88.519 C47.2@129.606,86.487
NetC48_2: C48.2 C51.1 R98.1 U11.7 | length 8.6
  Bottom Layer w0.5: U11.7@139.884,86.106 143.652,86.106 R98.1@143.957,86.411 ; C51.1@143.957,84.226 R98.1@143.957,86.411 ; C48.2@143.957,88.595 R98.1@143.957,86.411
NetC49_1: C49.1 R99.2 R105.1 U12.1 | length 10.4
  Bottom Layer w0.5: C49.1@113.157,79.69 R105.1@115.543,79.69 ; U12.1@116.402,84.836 115.874,84.836 115.824,84.786 115.824,79.971 R105.1@115.543,79.69 ; R99.2@117.729,79.691 R105.1@115.543,79.69
NetC49_2: C49.2 R104.1 R105.2 U12.2 | length 18.7
  Bottom Layer w0.5: R104.1@111.318,83.947 111.318,81.661 ; R105.2@115.443,77.79 C49.2@113.157,77.79 111.948,77.79 111.318,78.42 111.318,81.661 ; U12.2@116.402,86.106 116.352,86.056 115.139,86.056 114.681,85.598 114.681,82.423 113.919,81.661 111.318,81.661
NetC50_1: C50.1 R102.2 | length 4.3
  Bottom Layer w0.5: C50.1@122.301,79.69 124.14,79.69 124.78,80.33 R102.2@124.78,81.915
NetC50_2: C50.2 R95.2 R99.1 | length 4.6
  Bottom Layer w0.5: R99.1@117.729,77.791 117.796,77.724 117.862,77.79 C50.2@122.301,77.79
NetC51_2: C51.2 R94.1 R98.2 U11.6 | length 19.6
  Top Layer w0.5: v1(142.113,87.376) 142.113,81.026 143.383,79.756 v1(145.923,79.756)
  Bottom Layer w0.5: U11.6@139.884,87.376 v1(142.113,87.376) ; R98.2@145.857,86.411 C51.2@145.857,84.226 145.857,82.804 145.923,82.738 v1(145.923,79.756)
NetC52_1: C52.1 R104.2 | length 2.3
  Bottom Layer w0.5: R104.2@113.218,83.947 C52.1@113.218,86.201
NetC52_2: C52.2 R110.2 T13.1 | length 27.1
  Top Layer w0.5: v1(109.982,88.773) 112.014,88.773 113.03,89.789 113.03,105.664 114.3,106.934 T13.1@116.586,106.934
  Bottom Layer w0.5: v1(109.982,88.773) 111,88.773 R110.2@111.318,88.455 C52.2@111.318,86.201
NetC53_2: C53.2 C54.1 R106.1 U12.7 | length 8
  Bottom Layer w0.5: U12.7@121.342,86.106 124.551,86.106 C54.1@124.78,86.335 ; R106.1@124.78,84.125 C54.1@124.78,86.335 ; C53.2@124.78,88.544 C54.1@124.78,86.335
NetC54_2: C54.2 R102.1 R106.2 U12.6 | length 19
  Top Layer w0.5: v1(123.19,87.376) 123.19,80.772 124.206,79.756 v1(126.746,79.756)
  Bottom Layer w0.5: U12.6@121.342,87.376 v1(123.19,87.376) ; C54.2@126.68,86.335 R106.2@126.68,84.125 126.68,82.423 126.746,82.357 v1(126.746,79.756)
NetC55_1: C55.1 Q5.2 R107.1 U13.6 | length 22.6
  Top Layer w0.5: Q5.2@21.27,55.796 21.324,55.85 21.324,59.043 22.491,60.21 24.13,60.21 C55.1@25.781,60.21 26.162,60.591 26.162,64.158 R107.1@26.458,64.455 ; v1(24.892,68.072) U13.6@24.892,69.793
  Bottom Layer w0.5: v1(24.13,60.198) 24.892,60.96 v1(24.892,68.072)
NetC56_2: C56.2 U13.3 | length 2.5
  Top Layer w0.5: U13.3@24.892,74.733 C56.2@24.892,77.216
NetD3_2: D3.2 OK4.4 R62.1 R67.2 | length 8.8
  Top Layer w0.5: OK4.4@74.577,34.163 77.472,34.163 D3.2@77.599,34.036 77.597,34.034 77.597,32.419 78.801,31.215 R67.2@78.801,31.115 R62.1@78.801,28.829
NetD4_2: D4.2 OK4.1 R66.1 | length 9.3
  Top Layer w0.5: D4.2@59.072,28.575 59.58,29.083 60.579,29.083 61.468,29.972 61.468,31.054 R66.1@61.783,31.369 61.783,31.412 62.183,31.812 62.8,31.812 65.151,34.163 OK4.1@65.377,34.163
NetD5_2: D5.2 R86.2 | length 2
  Top Layer w0.5: D5.2@19.524,41.783 19.535,41.794 19.535,43.804 R86.2@19.545,43.815
NetD6_1: D6.1 L1.2 U13.1 | length 10.6
  Top Layer w0.5: U13.1@27.432,74.733 27.432,74.599 27.482,74.549 31.623,74.549 34.29,74.549 35.179,73.66 D6.1@35.179,71.374
NetL1_1: L1.1 R107.2 R109.1 U13.7 | length 10
  Top Layer w0.5: U13.7@26.162,69.793 26.162,69.392 26.112,69.342 26.162,69.292 26.162,66.651 R107.2@26.458,66.355 30.673,66.355 31.242,65.786 L1.1@31.242,64.389
NetOK1_1: OK1.1 R1.2 | length 4.7
  Top Layer w0.5: R1.2@61.529,42.418 62.992,42.418 65.024,40.386 OK1.1@65.377,40.386
NetOK1_2: OK1.2 Q2.3 | length 4.1
  Top Layer w0.5: Q2.3@61.722,36.83 63.98,36.83 64.996,37.846 OK1.2@65.377,37.846
NetOK1_3: OK1.3 R10.2 | length 4.9
  Top Layer w0.5: OK1.3@74.577,37.846 77.382,37.846 78.806,39.27 R10.2@78.806,39.37
NetOK2_1: OK2.1 R20.2 | length 7.3
  Top Layer w0.5: R20.2@61.595,51.181 64.262,51.181 65.377,50.066 OK2.1@65.377,46.99
NetOK2_2: OK2.2 Q4.3 | length 4.7
  Top Layer w0.5: Q4.3@61.754,45.72 63.807,45.72 65.077,44.45 OK2.2@65.377,44.45 OK2.2@64.996,44.831
NetOK2_3: OK2.3 R28.2 | length 5.3
  Top Layer w0.5: OK2.3@74.577,44.45 74.877,44.45 77.29,46.863 R28.2@78.872,46.863
NetQ1_1: Q1.1 R10.1 | length 2.8
  Top Layer w0.5: Q1.1@80.645,42.164 80.656,42.164 80.706,42.114 R10.1@80.706,39.37
NetQ2_1: Q2.1 R7.1 | length 4.3
  Top Layer w0.5: Q2.1@59.372,37.78 61.021,37.78 61.529,38.288 R7.1@61.529,40.259
NetQ3_1: Q3.1 R28.1 | length 2.8
  Top Layer w0.5: Q3.1@80.469,49.353 80.519,49.403 Q3.1@80.645,49.403 80.659,49.403 80.709,49.353 80.709,46.926 R28.1@80.772,46.863
NetQ4_1: Q4.1 R27.1 | length 4.3
  Top Layer w0.5: Q4.1@59.404,46.67 61.148,46.67 61.529,47.051 R27.1@61.529,49.022
NetR6_1: R6.1 R18.1 R23.2 T2.2 U1.3 | length 17.3
  Bottom Layer w0.5: U1.3@59.657,87.376 56.791,87.376 56.212,87.956 56.112,87.956 55.712,88.356 R18.1@55.712,88.456 R6.1@55.712,90.71 R23.2@55.712,92.964 61.722,92.964 62.23,93.472 T2.2@62.23,95.134
NetR8_1: R8.1 R19.1 R24.2 T3.2 U2.3 | length 14.8
  Bottom Layer w0.5: U2.3@98.114,87.376 95.466,87.376 94.296,88.546 R19.1@94.296,88.646 R8.1@94.296,90.869 R24.2@94.296,92.964 98.044,92.964 98.464,93.384 98.464,95.046 T3.2@98.552,95.134
NetR21_1: R21.1 R25.2 U1.5 | length 7.3
  Bottom Layer w0.5: U1.5@64.597,88.646 64.647,88.696 65.913,88.696 66.423,89.206 66.423,90.045 66.924,90.546 68.054,90.546 R25.2@68.288,90.78 R21.1@68.288,92.964
NetR22_1: R22.1 R26.2 U2.5 | length 7.1
  Bottom Layer w0.5: U2.5@103.054,88.646 104.521,88.646 104.902,89.027 104.902,90.297 105.195,90.59 106.201,90.59 R22.1@106.365,90.754 R26.2@106.365,92.964
NetR32_2: R32.2 R36.1 T4.1 | length 21.6
  Bottom Layer w0.5: R36.1@42.483,94.107 R32.2@42.483,96.266 40.259,96.266 39.497,97.028 39.497,102.997 40.386,103.886 T4.1@49.276,103.886
NetR33_1: R33.1 R47.1 R55.2 T5.2 U4.3 | length 17.1
  Bottom Layer w0.5: T5.2@134.493,42.534 136.155,44.196 R55.2@142.306,44.196 R33.1@142.306,46.323 ; U4.3@138.233,46.99 140.081,46.99 140.748,46.323 R33.1@142.306,46.323 ; R47.1@142.306,48.45 R33.1@142.306,46.323
NetR36_2: R36.2 R43.1 T4.2 | length 9.5
  Bottom Layer w0.5: R36.2@44.383,94.107 R43.1@44.383,91.948 44.383,89.856 45.165,89.074 T4.2@49.305,89.074
NetR48_1: R48.1 R56.1 R60.2 T7.2 U5.3 | length 15.6
  Bottom Layer w0.5: U5.3@78.683,87.376 76.26,87.376 75.744,87.892 75.644,87.892 75.244,88.292 R56.1@75.244,88.392 R60.2@75.244,90.678 R48.1@75.244,92.964 80.01,92.964 80.518,93.472 T7.2@80.518,95.134
NetR51_1: R51.1 R57.2 U4.5 | length 6.3
  Bottom Layer w0.5: R57.2@129.346,44.069 R51.1@129.346,46.128 ; R51.1@129.346,46.228 R51.1@129.346,46.128 ; U4.5@133.293,45.72 129.754,45.72 R51.1@129.346,46.128
NetR58_1: R58.1 R61.2 U5.5 | length 7.7
  Bottom Layer w0.5: U5.5@83.623,88.646 85.217,88.646 85.598,89.027 85.598,90.424 85.979,90.805 R58.1@87.441,90.805 R61.2@87.441,92.964
NetR59_1: R59.1 R63.2 U6.2 | length 26
  Top Layer w0.5: v1(42.418,61.087) R59.1@42.418,64.836 40.447,64.836 39.37,65.913 39.37,70.485 40.894,72.009 U6.2@44.463,72.009 ; v1(47.117,61.087) R63.2@47.117,64.709
  Top Layer w1: R63.2@47.117,64.709 R63.2@47.244,64.836
  Bottom Layer w0.5: v1(42.418,61.087) v1(47.117,61.087)
NetR64_2: R64.2 U6.7 | length 2.7
  Top Layer w0.5: U6.7@49.263,72.009 R64.2@52.009,72.009
NetR65_1: R65.1 R66.2 | length 2.2
  Top Layer w0.5: R66.2@59.883,31.369 R65.1@59.883,33.528
NetR70_1: R70.1 R78.1 R85.2 T9.2 U7.3 | length 14
  Bottom Layer w0.5: T9.2@98.298,42.534 99.833,44.069 R85.2@103.062,44.069 R70.1@103.062,46.164 ; U7.3@98.99,46.99 100.711,46.99 101.537,46.164 R70.1@103.062,46.164 ; R78.1@103.062,48.26 R70.1@103.062,46.164
NetR77_1: R77.1 R84.1 R89.2 T10.2 U8.3 | length 15.5
  Bottom Layer w0.5: T10.2@116.459,42.534 117.994,44.069 R89.2@122.621,44.069 R77.1@122.621,46.164 ; U8.3@118.421,46.99 120.459,46.99 121.285,46.164 R77.1@122.621,46.164 ; R84.1@122.621,48.26 R77.1@122.621,46.164
NetR83_1: R83.1 R87.2 U7.5 | length 6.4
  Bottom Layer w0.5: R87.2@89.978,44.069 R83.1@89.978,46.12 ; R83.1@89.978,46.196 R83.1@89.978,46.12 ; U7.5@94.05,45.72 90.378,45.72 R83.1@89.978,46.12
NetR88_1: R88.1 R90.2 U8.5 | length 5.5
  Bottom Layer w0.5: R90.2@110.169,44.069 R88.1@110.169,46.12 ; R88.1@110.169,46.126 R88.1@110.169,46.12 ; U8.5@113.481,45.72 110.569,45.72 R88.1@110.169,46.12
NetR93_1: R93.1 R100.1 R108.2 T12.2 U11.3 | length 13.2
  Bottom Layer w0.5: T12.2@134.493,95.134 134.493,93.599 133.858,92.964 R93.1@131.506,92.964 R108.2@131.506,90.805 131.506,88.419 131.906,88.019 132.033,88.019 132.676,87.376 U11.3@134.944,87.376
NetR101_1: R101.1 R110.1 R113.2 T13.2 U12.3 | length 13.4
  Bottom Layer w0.5: U12.3@116.402,87.376 114.197,87.376 113.218,88.355 R110.1@113.218,88.455 R101.1@113.218,90.71 R113.2@113.218,92.964 116.078,92.964 116.586,93.472 T13.2@116.586,95.134
NetR103_1: R103.1 R111.2 U11.5 | length 8
  Bottom Layer w0.5: U11.5@139.884,88.646 141.732,88.646 142.113,89.027 142.113,90.424 142.469,90.78 R103.1@143.957,90.78 R111.2@143.957,92.964
NetR109_2: R109.2 U13.8 | length 16.3
  Top Layer w0.5: U13.8@27.432,69.793 31.68,69.793 32.893,68.58 32.893,63.754 32.131,62.992 29.464,62.992 28.829,63.627 R109.2@28.829,64.455
NetR112_1: R112.1 R114.2 U12.5 | length 7.2
  Bottom Layer w0.5: U12.5@121.342,88.646 121.392,88.696 122.732,88.696 123.19,89.154 123.19,90.297 123.647,90.754 R114.2@124.78,90.754 R112.1@124.78,92.964
NetR115_2: R115.2 R116.2 U13.5 | length 5.5
  Top Layer w0.5: R116.2@21.717,66.355 23.749,66.355 23.622,66.482 U13.5@23.622,69.793
RES: J1.14 R29.2 U3.1 | length 119.7
  Top Layer w0.5: v1(65.405,66.421) 65.598,66.228 162.88,66.228 J1.14@164.084,65.024
  Bottom Layer w0.3: U3.1@48.264,71.303 48.264,69.846 48.768,69.342 52.578,69.342 53.34,68.58 R29.2@53.34,66.609
  Bottom Layer w0.5: R29.2@54.036,66.421 v1(65.405,66.421)
RS485_out1: J1.3 P1.1 | length 73.1
  Top Layer w0.5: P1.1@148.065,24.892 148.689,24.892 149.151,25.354 149.151,25.978 150.487,27.314 150.487,37.915 152.704,40.132 164.846,40.132 167.64,42.926 167.64,75.311 166.497,76.454 162.814,76.454 J1.3@161.544,77.724
RS485_out2: J1.4 P2.13 | length 54
  Top Layer w0.5: P2.13@148.022,112.776 148.36,112.776 148.822,112.314 148.822,85.493 151.257,83.058 165.608,83.058 167.005,81.661 167.005,78.486 166.37,77.851 164.211,77.851 J1.4@164.084,77.724
SAG: R45.2 U3.13 | length 4.3
  Bottom Layer w0.3: R45.2@42.291,81.6 42.291,80.391 42.672,80.01 43.307,80.01 43.714,79.603 U3.13@43.714,78.303
SCLK: J1.15 U3.18 | length 133
  Top Layer w0.5: v1(47.371,81.534) 58.904,81.534 60.73,79.708 60.73,66.905 65.151,62.484 J1.15@161.544,62.484
  Bottom Layer w0.3: U3.18@46.964,78.303 46.964,81.108 47.371,81.515 v1(47.371,81.534)
V1N: C11.1 R32.1 U3.5 | length 39.7
  Top Layer w0.3: v1(40.132,86.608) 44.317,86.608 45.969,88.26 v1(45.969,96.321)
  Bottom Layer w0.3: v1(40.132,86.608) 38.054,84.53 38.054,80.162 39.395,78.821 40.284,78.821 40.894,78.211 40.894,74.909 42.189,73.614 45.004,73.614 45.664,72.954 U3.5@45.664,71.303 ; R32.1@44.383,96.266 44.438,96.321 v1(45.969,96.321)
  Bottom Layer w0.5: R32.1@44.383,96.266 C11.1@44.383,98.323
V1P: C24.2 R43.2 U3.4 | length 32.7
  Bottom Layer w0.3: R43.2@42.483,91.948 42.483,87.822 39.836,85.175 38.978,84.317 38.608,83.947 38.608,80.391 39.624,79.375 40.513,79.375 41.529,78.359 41.529,75.057 42.418,74.168 45.466,74.168 46.314,73.32 U3.4@46.314,71.303 46.314,67.109 46.814,66.609 C24.2@46.863,66.609
V2N: R34.2 U6.6 | length 30.2
  Top Layer w0.5: U6.6@49.263,70.739 56.642,70.739 57.658,69.723 57.658,64.135 56.388,62.865 v1(53.975,62.865)
  Bottom Layer w0.5: R34.2@44.704,64.709 44.856,64.557 44.856,62.967 45.72,62.103 53.213,62.103 v1(53.975,62.865)
V2P: R64.1 U3.7 | length 20.4
  Top Layer w0.3: v1(43.942,68.199) v1(55.372,68.199) ; R64.1@53.782,72.39 53.909,72.263 v1(55.372,72.263)
  Bottom Layer w0.3: v1(43.942,68.199) 43.942,68.203 44.364,68.625 U3.7@44.364,71.303 ; v1(55.372,68.199) v1(55.372,72.263)
pads on no net: J1.5 M1.S M2.S M3.S M4.S P1.2 P1.3 P1.4 P1.5 P1.6 P1.7 P2.1 P2.2 P2.3 P2.4 P2.5 P2.6 P2.7 P2.8 P2.9 P2.10 P2.11 P2.12 T4.3 T4.4 U3.12 U6.9
copper on no net:
  other v2: 147.656,16.944 149.688,16.944 151.593,16.944 168.603,93.681 19.378,94.189 168.603,95.713 19.378,96.221 168.603,97.618 19.378,98.126 36.531,120.322 38.563,120.322 40.468,120.322 148.672,120.703 150.704,120.703 152.609,120.703

## Polygon pours and split planes (outlines as drawn)
GND on Top Layer "GND_L01_P004" (solid, remove dead copper, pour order 4): 28.167,27.158 28.167,39.604 18.007,39.604 18.007,99.421 28.167,99.421 28.167,109.835 34.644,109.835 34.644,121.9 153.77,121.9 153.77,109.835 159.993,109.835 159.993,99.421 170.026,99.421 170.026,38.334 159.866,38.334 159.866,27.412 153.77,27.412 153.77,15.474 34.136,15.474 34.136,27.158
no net on Top Layer "NONET_L01_P001" (solid, pour order 1): 153.924,122.047
no net on Top Layer "NONET_L01_P000" (solid, pour order 0): 153.924,122.047
no net on Bottom Paste "NONET_L-01_P-001" (none): 28.194,27.305 28.194,39.751 18.034,39.751 18.034,99.568 28.194,99.568 28.194,109.982 34.671,109.982 34.671,122.047 153.797,122.047 153.797,109.982 160.02,109.982 160.02,99.568 170.053,99.568 170.053,38.481 159.893,38.481 159.893,27.559 153.797,27.559 153.797,15.621 34.163,15.621 34.163,27.305
GND on Bottom Layer "GND_L02_P003" (solid, remove dead copper, pour order 3): 28.258,27.253 28.258,39.699 18.098,39.699 18.098,99.516 28.258,99.516 28.258,109.93 34.735,109.93 34.735,121.995 153.861,121.995 153.861,109.93 160.084,109.93 160.084,99.516 170.117,99.516 170.117,38.429 159.957,38.429 159.957,27.507 153.861,27.507 153.861,15.569 34.227,15.569 34.227,27.253
GND on Bottom Layer "GND_L02_P002" (solid, remove dead copper, pour order 2): 28.194,27.305 28.194,39.751 18.034,39.751 18.034,99.568 28.194,99.568 28.194,109.982 34.671,109.982 34.671,122.047 153.797,122.047 153.797,109.982 160.02,109.982 160.02,99.568 170.053,99.568 170.053,38.481 159.893,38.481 159.893,27.559 153.797,27.559 153.797,15.621 34.163,15.621 34.163,27.305

## Other copper
Top Layer:
  region: 53.086,70.485
Bottom Layer:
  region: 162.052,60.071

## Silkscreen, mask and mechanical layers (free items; w line width, h text height)
Bottom Solder:
  lines w0.254: 18.034,39.751 18.034,99.568 28.194,99.568 28.194,109.982 34.671,109.982 34.671,122.047 153.797,122.047 153.797,109.982 160.02,109.982 160.02,99.568 170.053,99.568 170.053,38.481 159.893,38.481 159.893,27.559 153.797,27.559 153.797,15.621 34.163,15.621 34.163,27.305 28.194,27.305 28.194,39.751 18.034,39.751
Mechanical 1:
  drawing of 969 lines, arcs and shapes, not listed

## Text inside footprints (layer, text, board x,y; h text height)
J1: Top Overlay "1" at 160.909,83.363 h1 r270; Top Overlay "2" at 163.5,83.693 h1 r270
?: Top Overlay "AC" at 48.499,29.852 h1.27 r90; Top Overlay "+VO" at 53.799,57.752 h1.27 r90; Top Overlay "-VO" at 43.099,57.752 h1.27 r90